# Altium PCB PCjnB3.PcbDoc (part 2 of 2)
Units mil, origin at the board's own origin, x right, y up, seen from the top; angles counter-clockwise.
Board outline 1930 x 3590 mil, 4 copper layers (Top Layer, Gnd, Voltage, Bottom Layer), stack 26.512 mil thick; 77 components, 87 nets, 563 pads, 158 vias.
Unrouted connection lines stored in the file: 78.
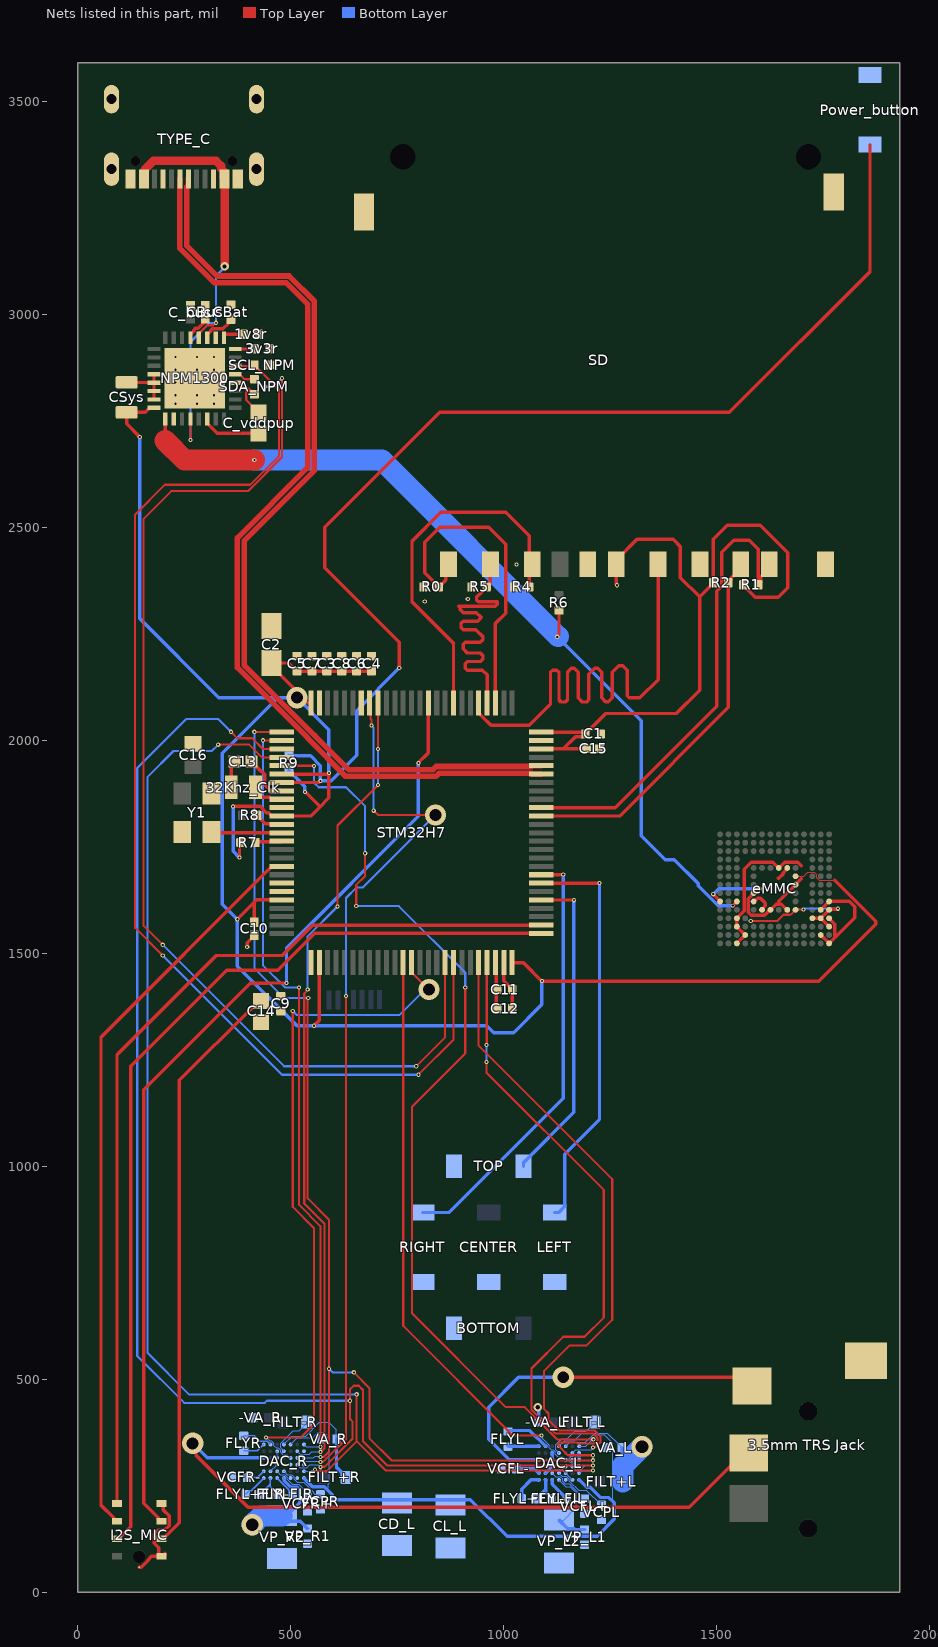
[diagram p3: the nets of this part, all layers, seen from the top]

## Via types
v1: diameter 10, hole 5, Top Layer to Bottom Layer, 144 vias
v2: diameter 50, hole 28, Top Layer to Bottom Layer, 9 vias
v3: diameter 50, hole 30, Top Layer to Bottom Layer, 2 vias
v4: diameter 20, hole 10, Top Layer to Bottom Layer, 2 vias
v5: diameter 8, hole 5, Top Layer to Bottom Layer, 1 vias

## Nets (pads, with @x,y where several pads share a name; then routed paths per layer and width w, separated by ;. In a path a pad name is that pad's centre, name@x,y a point inside that pad or via, vN(x,y) a via of type N, cw(c..) or ccw(c..) an arc to the next point about the centre after c; other vN are vias at no path point) (continued)
FILT-_L: DAC_L.D5 FILT-L.2 | length 137.3
  Bottom Layer w2: DAC_L.D5@1130,327.24 1130,327.76 1122.5,335.26 1122.5,346.1 1136.57,360.17 1149.28,360.17 1167.12,378 1193.12,378 1201.97,386.85 1202.71,386.85 1215.12,399.26 FILT-L.2@1215.12,400
FILT-_R: DAC_R.D5 FILT-R.2 | length 104.8
  Bottom Layer w2: DAC_R.D5@484.25,331.5 484.25,332.01 476.75,339.51 476.75,350.35 506.4,380 520,380 537.56,397.56 FILT-R.2@537.56,400
FLYC_VCPL: DAC_L.F1 FLYL+FIL-.2 FLYLFIL.1 | length 80.3
  Bottom Layer w8: FLYL+FIL-.2@1077.72,220 1077.72,220.98 1098.5,241.77 ; DAC_L.F1@1098.5,264.25 1098.5,241.77 ; FLYLFIL.1@1112.28,220 1112.28,220.98 1098.5,234.76 1098.5,241.77
FLYC_VCPR: DAC_R.F1 FLYL+FIR-.2 FLYLFIR.1 | length 78.8
  Bottom Layer w3: FLYL+FIR-.2@430,230 430,230.98 452.76,253.74 ; DAC_R.F1@452.76,268.5 452.76,253.74 ; FLYLFIR.1@470,230 470,230.98 452.76,248.23 452.76,253.74
FLYN_L: DAC_L.G6 FLYL.2 | length 73.4
  Bottom Layer w8: FLYL.2@1010,344.57 1011.38,343.18 1082.56,343.18 DAC_L.G6@1082.76,342.99
FLYN_R: DAC_R.G6 FLYR.2 | length 53.2
  Bottom Layer w3: FLYR.2@390,332.28 422.05,332.28 DAC_R.G6@437.01,347.24
FLYN_VCPL: DAC_L.G1 FLYL+FIL-.1 | length 71.9
  Bottom Layer w8: FLYL+FIL-.1@1042.28,220 1042.28,242.28 1064.25,264.25 DAC_L.G1@1082.76,264.25
FLYN_VCPR: DAC_R.G1 FLYL+FIR-.1 | length 58.7
  Bottom Layer w3: FLYL+FIR-.1@394.57,230 394.57,230.46 402.84,238.73 407.24,238.73 DAC_R.G1@437.01,268.5
FLYP_L: DAC_L.F6 FLYL.1 | length 103.8
  Bottom Layer w8: FLYL.1@1010,380 1061.5,380 DAC_L.F6@1098.5,342.99
FLYP_R: DAC_R.F6 FLYR.1 | length 71.2
  Bottom Layer w3: FLYR.1@390,367.72 414.96,367.72 427.43,355.24 440.32,355.24 440.52,355.05 444.95,355.05 DAC_R.F6@452.76,347.24
FLYP_VCPL: DAC_L.E1 FLYLFIL.2 | length 58.7
  Bottom Layer w8: DAC_L.E1@1114.25,264.25 1114.25,253.46 1140.89,226.83 1141.87,226.83 1147.72,220.98 FLYLFIL.2@1147.72,220
FLYP_VCPR: DAC_R.E1 FLYLFIR.2 | length 53.8
  Bottom Layer w3: DAC_R.E1@468.5,268.5 468.5,268.21 505.43,231.28 FLYLFIR.2@505.43,230
FS: DAC_L.B3 DAC_R.B3 STM32H7.3 | length 3405.7
  Top Layer w5: v1(360,2020) 375,2005 410,2005 435.15,1979.85 STM32H7.3@479.35,1979.85 ; v1(570,294) 570.96,294.96 579.96,294.96 645,360 645,401.57 639.5,407.07 v1(639.5,450) ; v1@637.19,450 639.5,452.31 639.5,476.57 647.93,485 660,485 670,475 670,355 727,298 v1(1210,298)
  Bottom Layer w2: DAC_R.B3@515.75,300 523.25,292.5 537.74,292.5 545.24,300 564,300 v1(570,294) ; DAC_L.B3@1161.5,295.75 1169,288.25 1181.5,288.25 1191.26,298 v1(1210,298)
  Bottom Layer w5: v1(360,2020) 330,2050 255,2050 140,1935 140,555 250,445 439.32,445 444.32,450 v1(639.5,450)
GND: 1v8r.1 3v3r.1 "3.5mm TRS Jack.1" -VA_L.1 -VA_R.1 BOTTOM.2 C1.2 C2.2 C3.1 C4.1 C5.1 C6.1 C7.1 C8.1 C9.1 C10.1 C11.1 C12.1 C14.1 C15.1 C16.1 C_bus.2 C_vddpup.1 CBat.2 CBus.1 CD_L.1 CENTER.2 CL_L.1 CSys.1 DAC_L.A3 DAC_L.A5 DAC_L.B1 DAC_L.C1 DAC_L.C2 DAC_L.C3 DAC_L.E3 DAC_L.E4 DAC_L.E5 DAC_L.F2 DAC_R.A3 DAC_R.A5 DAC_R.B1 DAC_R.C1 DAC_R.C3 DAC_R.E3 DAC_R.E4 DAC_R.E5 DAC_R.F2 eMMC.A6 eMMC.C1 eMMC.C3 eMMC.C4 eMMC.D2 eMMC.E7 eMMC.G5 eMMC.H10 eMMC.J5 eMMC.K8 eMMC.N2 eMMC.N5 eMMC.P1 eMMC.P4 eMMC.P6 I2S_MIC.5 I2S_MIC.6 I2S_MIC.9 LEFT.2 NPM1300.2 NPM1300.6 NPM1300.18 NPM1300.28 NPM1300.29 NPM1300.30 NPM1300.31 NPM1300.33 Power_button.2 RIGHT.2 SD.3 SD.6 SD.11 SD.12 SD.13 STM32H7.10 STM32H7.19 STM32H7.26 STM32H7.49 STM32H7.74 STM32H7.94 STM32H7.99 TOP.2 TYPE_C.A1_B12 TYPE_C.A8 TYPE_C.B1_A12 TYPE_C.B8 TYPE_C.S1 TYPE_C.S2 TYPE_C.S3 TYPE_C.S4 VA_L.1 VA_R.1 VCFL+.1 VCFL-.1 VCFR+.1 VCFR-.1 VCPL.1 VCPR.1 VP_L1.1 VP_L2.1 VP_R1.1 VP_R2.1 Y1.2 Y1.4 | length 1957.4
  Top Layer w8: CSys.1@115,2840.43 115.39,2840.05 178.95,2840.05 NPM1300.29@179.34,2839.66 ; I2S_MIC.5@145,59.41 149.56,59.41 165.76,75.61 165.76,76.82 173.55,84.61 I2S_MIC.6@190.66,84.61 ; NPM1300.31@179.34,2800.29 NPM1300.28@179.34,2859.34 ; I2S_MIC.6@194.53,84.61 190.66,88.48 190.66,104.48 179.55,115.59 179.55,136.3 189.86,146.61 204.86,146.61 215.17,156.92 215.17,179.83 201.57,193.43 201.57,204.75 197.69,208.62 I2S_MIC.9@197.36,208.62 ; I2S_MIC.6@197.36,84.61 201.3,84.61 205.17,88.48 I2S_MIC.6@205.17,92.42 ; NPM1300.6@304.37,2754 304.37,2744 327.98,2720.39 C_vddpup.1@425,2720.39 ; v1(398,1515) 398.38,1515.38 398.38,1525.24 415,1541.86 C10.1@415,1542.65 ; STM32H7.49@1000.54,1478.35 1000.54,1435.88 1020.43,1415.98 C11.1@1020.43,1415 C12.1@1020.43,1370 ; v1(1492,1639) 1492,1638.52 1508.15,1622.37 eMMC.A6@1508.15,1621.89 ; eMMC.C1@1547.52,1523.46 eMMC.D2@1567.2,1543.15 eMMC.C3@1547.52,1562.83 eMMC.C4@1547.52,1582.52 1565.12,1600.12 1565.12,1697.08 1581.55,1713.52 1632.12,1713.52 1645.01,1700.63 eMMC.H10@1645.94,1700.63 1646.88,1700.63 1659.77,1713.52 1690.65,1713.52 1698.2,1705.97 ; v1(1601,1652) 1600.62,1651.62 1598.5,1651.62 1588.45,1641.57 eMMC.E7@1586.89,1641.57 1586.89,1640.64 1574,1627.75 1574,1596.87 1581.55,1589.31 1612.44,1589.31 1625.33,1602.2 eMMC.G5@1626.26,1602.2 1627.19,1602.2 1640.08,1615.09 1645.94,1615.09 ; eMMC.J5@1665.63,1602.2 1664.7,1602.2 1651.81,1615.09 1645.94,1615.09 ; 1698.2,1675.08 1685.31,1662.19 eMMC.K8@1685.31,1661.26 1645.94,1621.89 1645.94,1615.09 ; eMMC.N2@1744.37,1543.15 eMMC.P1@1764.06,1523.46 1824,1583.41 1824,1609.41 1811.52,1621.89 eMMC.P6@1764.06,1621.89 eMMC.N5@1744.37,1602.2 ; eMMC.P4@1764.06,1582.52 1764.06,1581.59 1776.94,1568.7 1776.94,1537.29
  Bottom Layer w2: DAC_R.F2@452.76,284.25 DAC_R.E3@468.5,300 DAC_R.E5@468.5,331.5 ; DAC_L.E3@1114.25,295.75 1122.13,287.87 1137.87,287.87 ; DAC_L.C3@1145.75,295.75 1137.87,287.87 ; DAC_L.B1@1161.5,264.25 1160.98,264.25 1145.75,279.48 DAC_L.C2@1145.75,280 1137.87,287.87 ; DAC_L.A3@1177.24,295.75 1171.94,301.05 1167.97,301.05 1165.03,304 1158.39,304 1154,308.39 1154,314.6 1159.14,319.74 1164.6,319.74 1167.85,323 1171.1,323 1175.35,327.24 DAC_L.A5@1177.24,327.24
  Bottom Layer w8: v4(1079.95,434.95) 1079.95,431.7 1082.28,429.37 -VA_L.1@1082.28,400 ; DAC_L.F2@1098.5,280 DAC_L.E3@1114.25,295.75 DAC_L.E4@1114.25,311.5 DAC_L.E5@1114.25,327.24 ; v1(1492,1639) 1505,1652 v1(1601,1652)
  other v1: 230,2790 280,2790 320,2790 230,2810 280,2810 320,2810 230,2840 280,2840 320,2840 230,2870 280,2870 320,2870 230,2900 280,2900 320,2900
I2C1_SCL: DAC_R.B5 STM32H7.92 | length 1913.7
  Top Layer w5: v1(540,1415) 540,1413.65 532,1405.65 532,913 579.5,865.5 579.5,338.07 573.94,332.5 573.85,332.5 571.35,330 v1(570,330) ; v1(610,1610) 610,1800 v1(705,1895) ; v1(705,1980) 705.13,1980.13 705.13,2087.52 STM32H7.92@705.26,2087.65
  Bottom Layer w2: DAC_R.B5@515.75,331.5 523.25,324 543.49,324 549.49,330 v1(570,330)
  Bottom Layer w5: v1(540,1415) 540,1540 v1(610,1610) ; v1(705,1895) v1(705,1980)
I2C1_SDA: DAC_R.B4 STM32H7.93 | length 2107.1
  Top Layer w5: v1(570,306) 570.96,306.96 576.86,306.96 630,360.1 v1(630,1400) ; STM32H7.93@685.57,2087.65 687.59,2085.63 687.59,2051.11 690,2048.7 v1(690,2035) ; v1(695,1835) 705,1825 v2(840,1825)
  Bottom Layer w2: DAC_R.B4@515.75,315.75 523.25,308.25 565.59,308.25 567.84,306 v1(570,306)
  Bottom Layer w5: v1(630,1400) 630,1630 655,1655 670,1655 v2(840,1825) ; v1(690,2035) 695,2030 v1(695,1835)
I2C2_SCL: DAC_L.B5 STM32H7.46 | length 1526.9
  Top Layer w5: STM32H7.46@941.48,1478.35 941.48,1283.52 1255,970 1255,640 1195,580 1155,580 1094.45,519.45 1094.45,431.06 1105.5,420 1105.5,404.5 1130,380 1213.33,380 1227.16,366.18 1227.16,352.51 1215.95,341.3 1210.96,341.3 v1(1210,340.34)
  Bottom Layer w2: DAC_L.B5@1161.5,327.24 1169,334.74 1206.74,334.74 1210,338 v1(1210,340.34)
I2C2_SDA: DAC_L.B4 STM32H7.47 | length 1699.3
  Top Layer w5: v1(960,1245) 960,1220 1235,945 1235,645 1190,600 1140,600 1065.45,525.45 1065.45,428.94 1121.39,373 1210.43,373 1220.16,363.28 1220.16,355.41 1214.59,349.84 1173.79,349.84 1171.29,352.34 1130.48,352.34 1127.55,349.41 1127.55,345.27 1150.82,322 v1(1210,322) ; v1(960,1285) 960.58,1285.58 960.58,1477.77 STM32H7.47@961.17,1478.35
  Bottom Layer w2: DAC_L.B4@1161.5,311.5 1162.01,311.5 1169.51,319 1179.6,319 1182.61,322 v1(1210,322)
  Bottom Layer w5: v1(960,1245) v1(960,1285)
I2S_CK: I2S_MIC.1 STM32H7.52 | length 2175.9
  Top Layer w8: I2S_MIC.1@92.64,208.62 92.64,1262.64 325,1495 480,1495 551.46,1566.46 STM32H7.52@1088.65,1566.46
I2S_DIN: I2S_MIC.2 STM32H7.17 | length 1744.6
  Top Layer w8: I2S_MIC.2@92.64,167.28 88.7,167.28 84.83,171.16 84.83,175.09 55,204.92 55,1303.65 448.05,1696.7 448.66,1696.7 456.22,1704.26 STM32H7.17@479.35,1704.26
I2S_WS: I2S_MIC.3 STM32H7.51 | length 2217.6
  Top Layer w8: I2S_MIC.3@92.64,125.94 96.57,125.94 125,154.37 125,1235 350,1460 470,1460 556.78,1546.78 STM32H7.51@1088.65,1546.78
I2SEN: I2S_MIC.8 STM32H7.86 | length 2266.8
  Top Layer w8: I2S_MIC.8@197.36,167.28 193.43,167.28 189.55,171.16 189.55,175.09 155,209.65 155,1180 405,1430 446.62,1430 447.15,1430.53 v1(490.37,1430.53) ; v1(800,1947) 823.37,1970.37 STM32H7.86@823.37,2087.65
  Bottom Layer w8: v1(490.37,1430.53) 490.37,1512.19 800,1821.82 v1(800,1947)
LEFT: LEFT.1 STM32H7.57 | length 958.4
  Top Layer w8: STM32H7.57@1088.65,1664.89 1088.7,1664.94 1224.94,1664.94 v1(1225,1665)
  Bottom Layer w8: LEFT.1@1120,891.69 1128.86,891.69 1143.56,906.39 1143.56,1028.56 1225,1110 v1(1225,1665)
MLCK: DAC_L.A4 DAC_R.A4 STM32H7.1 | length 2738.7
  Top Layer w2: STM32H7.1@478.57,2020 STM32H7.1@479.35,2019.22
  Top Layer w5: v1(415,2020) STM32H7.1@478.57,2020 ; v1(541.5,1395) 540.54,1394.04 540.54,1390.51 540,1389.96 540,925 590,875 590,330 578,318 v1(570,318) ; v1(648.46,516.54) 685,480 685,362 737,310 v1(1210,310)
  Bottom Layer w2: DAC_R.A4@531.5,315.75 553.58,315.75 557.37,319.53 568.47,319.53 v1(570,318) ; DAC_L.A4@1177.24,311.5 1177.99,310.75 1209.25,310.75 v1(1210,310)
  Bottom Layer w5: v1(415,2020) 415,1465 485,1395 v1(541.5,1395) ; v1(590,525) 598.46,516.54 v1(648.46,516.54)
Net32Khz_Clk_2: 32Khz_Clk.2 C13.1 | length 63.1
  Top Layer w8: 32Khz_Clk.2@360.46,1890 360.46,1942.54 C13.1@367.92,1950
nPMSCL: NPM1300.14 SCL_NPM.2 STM32H7.43 | length 2753.3
  Top Layer w5: v1(200,1495) 135,1560 135,2530 205,2600 405.1,2600 473,2667.9 473,2822.3 422.63,2872.67 415.28,2880.02 SCL_NPM.2@415.28,2881 413.31,2879.03 NPM1300.14@370.34,2879.03 ; v1(800,1215) 882.43,1297.43 STM32H7.43@882.43,1478.35
  Bottom Layer w5: v1(200,1495) 480,1215 v1(800,1215)
nPMSDA: NPM1300.13 SDA_NPM.2 STM32H7.42 | length 2702.3
  Top Layer w5: v1(200,1520) 155,1565 155,2520 220,2585 400,2585 480,2665 v1(480,2850) ; NPM1300.13@370.34,2859.34 380.34,2859.34 391.97,2847.72 SDA_NPM.2@415,2847.72 ; SDA_NPM.2@415.98,2847.72 432.74,2830.96 439.04,2830.96 v1(440,2830) ; v1(795,1235) 862.74,1302.74 STM32H7.42@862.74,1478.35
  Bottom Layer w5: v1(200,1520) 485,1235 v1(795,1235) ; v1(440,2830) 460,2830 v1(480,2850)
NRST: R7.1 STM32H7.14 | length 63
  Top Layer w8: R7.1@417.72,1760 419.37,1761.66 477.7,1761.66 STM32H7.14@479.35,1763.32
Osc25mhzin: R8.2 STM32H7.12 | length 67
  Top Layer w8: R8.2@421.72,1824 421.72,1823.02 440.14,1804.59 477.45,1804.59 STM32H7.12@479.35,1802.68
Osc25mhzout: STM32H7.13 Y1.1 | length 154
  Top Layer w8: Y1.1@326.45,1785.72 329.17,1783 STM32H7.13@479.35,1783
Osc32khz_in: C13.2 STM32H7.8 | length 113.8
  Top Layer w8: C13.2@408.08,1950 429.94,1928.14 431.63,1928.14 439.52,1920.24 439.52,1896.1 452.29,1883.33 477.45,1883.33 STM32H7.8@479.35,1881.43
Osc32khz_out: 32Khz_Clk.1 STM32H7.9 | length 81
  Top Layer w8: 32Khz_Clk.1@417.54,1890 417.54,1877.2 428.31,1866.44 451.52,1866.44 456.22,1861.74 STM32H7.9@479.35,1861.74
Power_button: Power_button.1 R9.1 STM32H7.7 | length 2797
  Top Layer w8: STM32H7.7@479.35,1901.11 565.57,1901.11 569.46,1905 v1(570,1905) ; v1(755,2170) 755,2230 580,2405 580,2500 850,2770 1530,2770 1860,3100 1860,3398.31
  Bottom Layer w8: R9.1@496,1963.72 546.84,1963.72 570,1940.56 v1(570,1905) 595,1905 655,1965 655,2070 v1(755,2170)
RESET_L: DAC_L.C4 STM32H7.37 | length 1373.9
  Top Layer w5: STM32H7.37@764.31,1478.35 764.31,625.68 1021.5,368.5 v1(1089.17,368.5)
  Bottom Layer w2: v1(1089.17,368.5) 1090.7,366.97 1090.7,361.4 1106.75,345.35 1106.75,339.89 1111.52,335.12 1116.98,335.12 1121.75,330.35 1121.75,324.89 1127.64,319 1138.25,319 DAC_L.C4@1145.75,311.5
RESET_R: DAC_R.C4 STM32H7.38 | length 1630.5
  Top Layer w5: v1(442.13,363.55) 523.55,363.55 555,395 555,855 505,905 v1(505,1365) ; STM32H7.38@784,1478.35 784,1455.22 824.22,1415 v2(825,1415)
  Bottom Layer w2: v1(442.13,363.55) 442.81,363.55 450.51,355.86 454.75,355.86 460.91,349.7 460.91,344.23 465.96,339.18 471.42,339.18 476.38,334.23 476.38,328.76 481.89,323.25 492.5,323.25 DAC_R.C4@500,315.75
  Bottom Layer w5: v1(505,1365) 515,1355 755,1355 815,1415 v2(825,1415)
RIGHT: RIGHT.1 STM32H7.58 | length 1017.7
  Top Layer w8: STM32H7.58@1088.65,1684.57 1088.86,1684.79 1139.79,1684.79 v1(1140,1685)
  Bottom Layer w8: RIGHT.1@810,891.69 871.69,891.69 1140,1160 v1(1140,1685)
RING: "3.5mm TRS Jack.3" DAC_R.G4 | length 1619.3
  Top Layer w8: v2(270,350) 278.04,341.96 278.04,321.96 400,200 1435.55,200 1533.96,298.41 1533.96,300.38 1573.27,339.68 1575.24,339.68
  Bottom Layer w8: v2(270,350) 304.25,315.75 DAC_R.G4@437.01,315.75
SAISCK: DAC_L.A2 DAC_R.A2 STM32H7.4 | length 3126.7
  Top Layer w5: v1(330,1990) 402.79,1990 432.62,1960.17 STM32H7.4@479.35,1960.17 ; v1(557.23,288.24) 558.58,288.24 562.32,284.5 584.5,284.5 655,355 ; v1(655,465) 655,355 ; v1(1210,286) 724,286 655,355
  Bottom Layer w2: DAC_R.A2@531.5,284.25 546.76,284.25 549.23,286.72 555.71,286.72 v1(557.23,288.24) ; DAC_L.A2@1177.24,280 1178.91,280 1184.91,286 v1(1210,286)
  Bottom Layer w5: v1(330,1990) 315,1975 225,1975 164.33,1914.33 164.33,561.87 261.19,465 v1(655,465)
SD_A: DAC_L.A6 STM32H7.5 | length 2261.5
  Top Layer w5: STM32H7.5@479.35,1940.48 554.52,1940.48 v1(555,1940) ; v1(654,1611) 654,1660.72 675,1681.72 v1(675,1735) ; v1(910,1420) 910,1265 785,1140 785,655 1005,435 1049.49,435 1125.15,359.34 v1(1210.66,359.34)
  Bottom Layer w2: DAC_L.A6@1177.24,342.99 1192.99,342.99 1209.34,359.34 v1(1210.66,359.34)
  Bottom Layer w5: v1(555,1940) 555,1900.96 565.96,1890 630,1890 675,1845 v1(675,1735) ; v1(654,1611) 754,1611 910,1455 v1(910,1420)
SD_B: DAC_R.A6 STM32H7.2 | length 1818.2
  Top Layer w2: STM32H7.2@478.89,2000 STM32H7.2@479.35,1999.54
  Top Layer w5: v1(435,2000) STM32H7.2@478.89,2000 ; v1(520,1420) 520,909.58 570,859.58 v1(570,342)
  Bottom Layer w2: DAC_R.A6@531.5,347.24 536.74,342 v1(570,342)
  Bottom Layer w5: v1(435,2000) 435,1472.47 487.47,1420 v1(520,1420)
SD_CLK: SD.5 STM32H7.80 | length 1323.3
  Top Layer w8: STM32H7.80@941.48,2087.65 941.48,2064.52 949.04,2056.95 949.04,2056.34 970.38,2035 1060,2035 1105,2080 1105.31,2080 1110,2084.69 1110,2160 1115,2165 1125,2165 1130,2160 1130,2094.69 1134.69,2090 1145,2090 1150,2095 1150,2160 1159.19,2169.19 1165.81,2169.19 1175,2160 1175,2100 1185,2090 1195,2090 1200,2095 1200,2155 1214.19,2169.19 1220.81,2169.19 1230,2160 1230,2100 1239.19,2090.81 1245.81,2090.81 1255,2100 1255,2160 1270,2175 1280,2175 1290,2165 1290,2104.69 1294.69,2100 1320,2100 1362.65,2142.65 SD.5@1362.65,2413.31
SD_CMD: R4.2 SD.2 STM32H7.83 | length 866
  Top Layer w8: STM32H7.83@882.43,2087.65 882.43,2227.57 785,2325 785,2467.5 852.5,2535 1005,2535 1060,2480 1060,2413.31 R4.2@1060,2360
SD_DAT0: R2.2 SD.7 STM32H7.65 | length 892.4
  Top Layer w8: STM32H7.65@1088.65,1822.37 1272.37,1822.37 1527.72,2077.72 R2.2@1527.72,2370 1533.56,2375.84 1533.56,2380.47 1556.55,2403.46 SD.7@1556.55,2413.31
SD_DAT1: R1.2 SD.8 STM32H7.66 | length 1125.8
  Top Layer w8: STM32H7.66@1088.65,1842.06 1262.06,1842.06 1500,2080 1500,2350 1511.87,2361.88 1511.87,2441.87 1540,2470 1576.63,2470 1597.72,2448.91 R1.2@1597.72,2365 1603.56,2370.84 1603.56,2383.54 1623.48,2403.46 SD.8@1623.48,2413.31
SD_DAT2: R0.2 SD.9 STM32H7.78 | length 789
  Top Layer w8: SD.9@870.53,2413.31 875,2408.83 864.18,2398.02 864.18,2376.47 854.54,2366.83 853.56,2366.83 R0.2@847.72,2360.98 ; STM32H7.78@980.85,2087.65 980.85,2274.27 1005,2298.42 1005,2460 965,2500 850,2500 815,2465 815,2393.7 R0.2@847.72,2360.98 ; R0.2@847.72,2360.98 R0.2@847.72,2360 R0.2@847.72,2360.98
SD_DAT3: R5.2 SD.1 STM32H7.79 | length 744.4
  Top Layer w8: R5.2@960,2360.98 968.95,2369.94 SD.1@968.95,2413.31 ; R5.2@960.58,2359.42 R5.2@960,2360 960,2359.02 942.95,2341.97 941.97,2341.97 936.31,2336.31 936.31,2329.69 941,2325 985,2325 985,2319.69 980.31,2315 895,2315 898.47,2311.53 898.47,2306.84 900,2305.31 900,2305 905,2300 935.75,2300 947.06,2288.69 943.69,2285.31 943.69,2284.69 939,2280 905,2280 900,2275 900,2265 905,2260 935,2260 951.69,2243.31 951.69,2236.69 945,2230 909.69,2230 905,2225.31 905,2215 915,2205 945,2205 951.69,2198.31 951.69,2191.69 945,2185 915,2185 910,2180 910,2169.69 914.69,2165 950,2165 961.17,2153.83 STM32H7.79@961.17,2087.65
TIP: "3.5mm TRS Jack.2" DAC_L.G4 | length 863.4
  Top Layer w8: v2(1140,505) 1575.28,505 1583.11,497.17
  Bottom Layer w8: DAC_L.G4@1082.76,311.5 1013.07,311.5 965,359.57 965,435 1035,505 v2(1140,505)
TOP: STM32H7.55 TOP.1 | length 750.6
  Top Layer w8: STM32H7.55@1088.65,1625.52 1088.91,1625.26 1164.74,1625.26 v1(1165,1625)
  Bottom Layer w8: TOP.1@1046.69,1000 1046.69,1008.86 1165,1127.17 v1(1165,1625)
USB_D_N: STM32H7.70 TYPE_C.A7 | length 2262.3
  Top Layer w13: TYPE_C.A7@240.16,3317.99 240.16,3154.84 321,3074 490,3074 540,3024 540,2640 375,2475 375,2170.54 540.5,2005.04 540.5,2004.5 629.5,1915.5 841.18,1915.5 848.31,1922.64 1064.86,1922.64 1066.7,1920.8 STM32H7.70@1088.65,1920.8
USB_D_P: STM32H7.71 TYPE_C.A6 | length 2237.3
  Top Layer w13: TYPE_C.A6@259.84,3317.99 259.84,3302.65 256.16,3298.96 256.16,3161.47 327.62,3090 496.63,3090 556,3030.63 556,2633.37 391,2468.37 391,2177.16 556.5,2011.66 556.5,2011.12 636.12,1931.5 834.55,1931.5 841.69,1938.64 1064.86,1938.64 1066.7,1940.48 STM32H7.71@1088.65,1940.48
VAL: CD_L.2 CL_L.2 DAC_L.A1 DAC_L.C6 DAC_L.D1 DAC_L.D2 DAC_L.D6 DAC_R.A1 DAC_R.C6 DAC_R.D1 DAC_R.D2 DAC_R.D6 eMMC.C6 eMMC.K5 eMMC.M4 eMMC.N4 eMMC.P3 eMMC.P5 FILT+L.2 FILT+R.2 NPM1300.1 R6.2 VA_L.2 VA_R.2 VCPL.2 VCPR.2 VP_L1.2 VP_L2.2 VP_R1.2 VP_R2.2 | length 5164.1
  Top Layer w5: v1(1580,1576) 1642.05,1576 1656.86,1590.81 1670.35,1590.81 ; 1670.37,1590.84 1673.95,1590.84 eMMC.K5@1685.31,1602.2 1685.71,1602.6 1703.6,1602.6 v1(1704,1603)
  Top Layer w8: 205.94,2703.06 NPM1300.1@205.94,2754 ; v1(1126,2243) 1126,2243.54 1130,2247.54 R6.2@1130,2305 ; v5(1538,1612) 1547.52,1621.52 eMMC.C6@1547.52,1621.89 ; eMMC.M4@1724.69,1582.52 eMMC.N4@1744.37,1582.52 ; eMMC.P3@1764.06,1562.83 eMMC.N4@1744.37,1582.52 ; v1(1785,1605) 1784.46,1605 1782.77,1603.31 1765.16,1603.31 eMMC.P5@1764.06,1602.2 eMMC.N4@1744.37,1582.52
  Top Layer w50: 205.94,2703.06 251,2658 v1(415,2658)
  Bottom Layer w1: VP_L2.2@1130,170 1140.83,170 1170.38,199.56 1170.38,234.39 1156.71,248.06 1146.19,248.06 DAC_L.D1@1130,264.25 ; DAC_L.D2@1130,280 1137.19,272.81 1147.09,272.81 1154.5,265.4 1154.5,261.35 1175.85,240 1194.45,240 1229.02,205.43 VCPL.2@1230,205.43
  Bottom Layer w2: DAC_R.D2@484.25,284.25 484.77,284.25 492.27,276.75 502.36,276.75 508.25,270.86 508.25,265.4 515.3,258.35 530.56,258.35 553.83,235.08 553.83,232.35 556.17,230 VCPR.2@570,230 ; DAC_R.D6@484.25,347.24 504.15,367.14 535,367.14 567.86,400 590,400 607.72,382.28 VA_R.2@607.72,360 ; DAC_R.C6@500,347.24 515.9,363.14 551.95,363.14 565.09,376.27 579.48,376.27 585.13,370.63 585.13,364.87 590.88,359.12 590.88,255.7 588.69,253.51 588.69,239.02 ; DAC_L.D6@1130,342.99 1143.17,356.17 1166.17,356.17 1184,374 1243.72,374 1268.79,348.93 1268.99,348.93 1277.72,340.19 VA_L.2@1277.72,340 ; DAC_L.C6@1145.75,342.99 1154.92,352.17 1192.17,352.17 1210,370 1235.75,370 1255.96,349.79 1255.96,214.04
  Bottom Layer w5: v1(1704,1603) 1705.35,1603 1707.35,1605 v1(1785,1605)
  Bottom Layer w8: VP_R2.2@480,180 492.75,167.25 522.75,167.25 533.17,156.83 533.17,155.84 539.02,150 VP_R1.2@540,150 ; DAC_R.D1@484.25,268.5 484.44,268.31 484.44,263.55 500.65,247.35 515.8,247.35 521.28,241.87 521.28,210.45 VP_R2.2@490.83,180 ; DAC_R.A1@531.5,268.5 551.49,248.51 579.2,248.51 588.69,239.02 598.18,229.53 598.18,222.67 602.87,217.98 922.02,217.98 1008.13,131.87 1219.59,131.87 1260,172.29 1260,210 1255.96,214.04 1247.28,222.72 1227.62,222.72 1203.84,246.5 1195,246.5 DAC_L.A1@1177.24,264.25 ; VA_R.2@607.72,360 607.72,294.24 630,271.96 FILT+R.2@630,270 ; v1(1126,2243) 1323,2046 1323,1776.44 1379.22,1720.22 1400.78,1720.22 1457,1664 1457,1658.44 1503.44,1612 v5(1538,1612) ; VP_L2.2@1130,170 1150.61,149.39 1165.5,149.39 1167.17,147.72 VP_L1.2@1190,147.72 ; VA_L.2@1277.72,340 1278.86,338.86 1278.86,297
  Bottom Layer w50: v3(410,159) 430.61,179.61 479.61,179.61 VP_R2.2@480,180 ; v1(415,2658) 714,2658 v1@1128,2244 ; FILT+L.2@1280,260 1280,297 v3(1325,342)
VBAT: CBat.1 NPM1300.19 | length 88.1
  Top Layer w8: NPM1300.19@304.37,2945 304.37,2955 305.37,2956 308.37,2956 313.06,2960.69 313.06,2962.49 316.57,2966 341,2966 353.17,2978.17 353.17,2981.44 361.72,2989.98 CBat.1@364.98,2989.98
VBUSIN: CBus.2 NPM1300.21 | length 66.1
  Top Layer w8: NPM1300.21@265,2945 265,2955 266,2956 268,2956 272.69,2960.69 272.69,2962.9 276.79,2967 283.14,2967 305,2988.86 CBus.2@305,2989.65
VCAP: C1.1 C2.1 C3.2 C4.2 C5.2 C6.2 C7.2 C8.2 C9.2 C10.2 C11.2 C12.2 C14.2 C15.2 CSys.2 eMMC.E6 eMMC.F5 eMMC.J10 eMMC.K9 I2S_MIC.7 NPM1300.32 R0.1 R1.1 R2.1 R4.1 R5.1 R7.2 R9.2 SD.4 STM32H7.6 STM32H7.11 STM32H7.20 STM32H7.21 STM32H7.27 STM32H7.48 STM32H7.50 STM32H7.73 STM32H7.75 STM32H7.100 | length 8679.3
  Top Layer w1: eMMC.K9@1683.75,1680.94 1684.39,1681.58 1704.62,1681.58 1713.37,1690.33 1728.57,1690.33 1734.53,1684.38 1734.53,1677.51 1740.48,1671.56 1776.89,1671.56 1777.17,1671.83
  Top Layer w8: CSys.2@115,2769.96 115,2743 v1(146,2712) ; CSys.2@130,2770 158.74,2770 169.34,2780.6 NPM1300.32@179.34,2780.6 ; I2S_MIC.7@197.36,125.94 201.3,125.94 239,163.65 239,1202 410.91,1373.91 416.3,1373.91 434.41,1392.02 C14.2@434.41,1397.41 ; v1(365,1845) 428.43,1845 443.28,1830.15 448.44,1830.15 456.22,1822.37 STM32H7.11@479.35,1822.37 547.37,1822.37 567,1842 ; v1(375,1580) 415,1620 ; v1(380,1725) 380,1757.72 R7.2@382.28,1760 ; C10.2@415,1573.35 415,1620 ; STM32H7.21@479.35,1625.52 420.52,1625.52 415,1620 ; STM32H7.6@479.35,1920.8 586.92,1920.8 589.46,1923.33 v1(590,1923.33) 590,1865 567,1842 ; v1(534,1879) 567,1846 567,1842 ; STM32H7.100@547.78,2087.65 539.26,2087.65 526.64,2100.27 v2(515.27,2100.27) 507.23,2108.31 507.23,2122.57 455,2174.8 C2.1@455,2181.69 494.61,2181.69 514.02,2162.28 C5.2@515,2162.28 C7.2@550,2162.28 C3.2@585,2162.28 C8.2@620,2162.28 C6.2@655,2162.28 C4.2@690,2162.28 ; v1(555,1330) 567.46,1342.46 STM32H7.27@567.46,1478.35 ; STM32H7.48@980.85,1478.35 982.76,1476.45 982.76,1372.24 C12.2@985,1370 ; STM32H7.50@1020.22,1478.35 1046.65,1478.35 v1(1090,1435) 1740,1435 1873.69,1568.69 1873.69,1575.31 1777.17,1671.83 ; STM32H7.75@1088.65,2019.22 1186.44,2019.22 1189.36,2016.3 1189.36,2011.64 1186.44,2008.72 1168.72,2008.72 1139.93,1979.93 ; STM32H7.73@1088.72,1979.93 1139.93,1979.93 ; C1.1@1192.28,2015 1192.28,2015.98 1239.3,2063 1405,2063 1460,2118 1460,2337 ; C15.2@1194.65,1980 1194.57,1979.93 1139.93,1979.93 ; v1(1266,2364) 1266,2364.54 1264.23,2366.31 SD.4@1264.23,2413.31 1264.23,2423.15 1313.08,2472 1398,2472 1415,2455 1415,2382 1460,2337 ; R1.1@1562.28,2365 1562.28,2364.02 1590.3,2336 1645,2336 1667,2358 1667,2440.31 1602.31,2505 1525,2505 1492.28,2472.28 R2.1@1492.28,2370 1492.28,2369.02 1473.35,2350.09 1473.09,2350.09 1460,2337 ; eMMC.E6@1589.89,1623.33 1596.3,1629.74 1602.93,1629.74 1614.42,1618.24 1614.42,1611.62 1606.57,1603.77 eMMC.F5@1606.57,1602.2 ; 1644,1676 1645.75,1676 1656.06,1686.31 1656.06,1689.5 1665.63,1699.07 eMMC.J10@1665.63,1700.63
  Bottom Layer w8: v1(146,2712) 146,2286 331.73,2100.27 470.27,2100.27 ; v1(365,1845) 365,1740 v1(380,1725) ; R9.2@496,1928.28 496.98,1928.28 533.62,1891.65 533.62,1879.38 v1(534,1879) ; v1(590,1923.33) 590,2025 515.27,2099.73 v2(515.27,2100.27) 470.27,2100.27 ; v1(1090,1435) 1090,1380 1023.31,1313.31 976.69,1313.31 960,1330 v1(555,1330) 515,1330 375,1470 v1(375,1580) 340,1615 340,1970 470.27,2100.27
  other v1: 815,2326 916,2332 1030,2413
VCP_F+L: DAC_L.E2 VCFL+.2 | length 100.4
  Bottom Layer w2: DAC_L.E2@1114.25,280 1122.5,271.75 1133.11,271.75 1138.25,266.61 1138.25,261.15 1143.98,255.41 1154.31,255.41 1182.28,227.44 VCFL+.2@1182.28,220
VCP_F+R: DAC_R.E2 VCFR+.2 | length 99
  Bottom Layer w2: DAC_R.E2@468.5,284.25 476,276.75 486.61,276.75 492.5,270.86 492.5,265.4 503.55,254.35 518.7,254.35 531.27,241.78 531.27,238.93 540,230.19 VCFR+.2@540,230
VCP_F-L: DAC_L.G2 VCFL-.2 | length 56.9
  Bottom Layer w8: VCFL-.2@1030,290 1072.49,290 1082.49,280 DAC_L.G2@1082.76,280
VCP_F-R: DAC_R.G2 VCFR-.2 | length 45.2
  Bottom Layer w3: VCFR-.2@397.72,270 422.76,270 DAC_R.G2@437.01,284.25
VDDIO: C_vddpup.2 NPM1300.12 SCL_NPM.1 SDA_NPM.1 | length 122.7
  Top Layer w5: NPM1300.12@370.34,2839.66 380.34,2839.66 395.82,2824.18 395.82,2798.79 C_vddpup.2@425,2769.61
  Top Layer w8: 395.82,2824.18 402.12,2824.18 414.02,2812.28 SDA_NPM.1@415,2812.28
VNET: NPM1300.4 NPM1300.20 TYPE_C.A4_B9 TYPE_C.B4_A9 | length 1015.1
  Top Layer w5: v1(265,2705) NPM1300.4@265,2754 ; NPM1300.20@284.69,2945 284.69,2955 303.81,2974.12 312.67,2974.12 313.05,2974.5 318.15,2974.5 323.65,2980 v1(325,2980)
  Top Layer w20: TYPE_C.B4_A9@155.51,3317.99 157.32,3319.8 157.32,3339.53 177.79,3360 325.09,3360 336.8,3348.28 336.8,3342.15 342.68,3336.27 342.68,3319.8 TYPE_C.A4_B9@344.49,3317.99 ; v4(345,3112.5) TYPE_C.A4_B9@345,3317.48
  Bottom Layer w5: v1(265,2705) 265,2935 310,2980 v1(325,2980) 325,3090 345,3110 v4@345,3115
VSET1: 1v8r.2 NPM1300.17 | length 54
  Top Layer w8: NPM1300.17@343.74,2945 343.74,2952 344.74,2953 1v8r.2@390.28,2953
VSET2: 3v3r.2 NPM1300.16 | length 45.5
  Top Layer w8: NPM1300.16@370.34,2918.4 370.64,2918.7 415.27,2918.7 3v3r.2@415.57,2919
pads on no net: "3.5mm TRS Jack.4" "3.5mm TRS Jack." DAC_L.B2 DAC_L.B6 DAC_L.C5 DAC_L.D3 DAC_L.F3 DAC_L.F4 DAC_L.F5 DAC_L.G3 DAC_L.G5 DAC_R.B2 DAC_R.B6 DAC_R.C2 DAC_R.C5 DAC_R.D3 DAC_R.F3 DAC_R.F4 DAC_R.F5 DAC_R.G3 DAC_R.G5 eMMC.A1 eMMC.A2 eMMC.A7 eMMC.A8 eMMC.A9 eMMC.A10 eMMC.A11 eMMC.A12 eMMC.A13 eMMC.A14 eMMC.B1 eMMC.B3 eMMC.B4 eMMC.B5 eMMC.B6 eMMC.B7 eMMC.B8 eMMC.B9 eMMC.B10 eMMC.B11 eMMC.B12 eMMC.B13 eMMC.B14 eMMC.C2 eMMC.C5 eMMC.C7 eMMC.C8 eMMC.C9 eMMC.C10 eMMC.C11 eMMC.C12 eMMC.C13 eMMC.C14 eMMC.D1 eMMC.D3 eMMC.D4 eMMC.D12 eMMC.D13 eMMC.D14 eMMC.E1 eMMC.E2 eMMC.E3 eMMC.E5 eMMC.E8 eMMC.E9 eMMC.E10 eMMC.E12 eMMC.E13 eMMC.E14 eMMC.F1 eMMC.F2 eMMC.F3 eMMC.F10 eMMC.F12 eMMC.F13 eMMC.F14 eMMC.G1 eMMC.G2 eMMC.G3 eMMC.G10 eMMC.G12 eMMC.G13 eMMC.G14 eMMC.H1 eMMC.H2 eMMC.H3 eMMC.H5 eMMC.H12 eMMC.H13 eMMC.H14 eMMC.J1 eMMC.J2 eMMC.J3 eMMC.J12 eMMC.J13 eMMC.J14 eMMC.K1 eMMC.K2 eMMC.K3 eMMC.K6 eMMC.K7 eMMC.K10 eMMC.K12 eMMC.K13 eMMC.K14 eMMC.L1 eMMC.L2 eMMC.L3 eMMC.L12 eMMC.L13 eMMC.L14 eMMC.M1 eMMC.M2 eMMC.M3 eMMC.M7 eMMC.M8 eMMC.M9 eMMC.M10 eMMC.M11 eMMC.M12 eMMC.M13 eMMC.M14 eMMC.N1 eMMC.N3 eMMC.N6 eMMC.N7 eMMC.N8 eMMC.N9 eMMC.N10 eMMC.N11 eMMC.N12 eMMC.N13 eMMC.N14 eMMC.P2 eMMC.P7 eMMC.P8 eMMC.P9 eMMC.P10 eMMC.P11 eMMC.P12 eMMC.P13 eMMC.P14 I2S_MIC. I2S_MIC.4 NPM1300.3 NPM1300.5 NPM1300.7 NPM1300.8 NPM1300.9 NPM1300.10 NPM1300.11 NPM1300.15 NPM1300.25 NPM1300.26 NPM1300.27 SD.MH1 SD.MH2 STM32H7.15 STM32H7.18 STM32H7.23 STM32H7.24 STM32H7.25 STM32H7.30 STM32H7.35 STM32H7.36 STM32H7.39 STM32H7.40 STM32H7.41 STM32H7.44 STM32H7.45 STM32H7.59 STM32H7.60 STM32H7.62 STM32H7.63 STM32H7.64 STM32H7.67 STM32H7.68 STM32H7.69 STM32H7.77 STM32H7.81 STM32H7.82 STM32H7.84 STM32H7.85 STM32H7.87 STM32H7.88 STM32H7.91 STM32H7.95 STM32H7.96 STM32H7.97 STM32H7.98 TYPE_C. TYPE_C.B6 TYPE_C.B7
copper on no net:
  other v1: 990,1335 1888,1458 1456,1466 1669,1491 872,1605 1416,1609 930,1626 826,1634 742,1647 573,1657 863,1669 990,1676 807,1692 896,1705 1487,1719 957,1721 1649,1727 1839.08,1731.53 1839.08,1731.53 568,1761 734,1786 1825,1807 1010,1812 913,1814 1673,1820 1511,1826 1789,1827 953,1853 755,1865 909,1874 1016,1875 960,1886 941,2000 888,2001

## Polygon pours and split planes (outlines as drawn)
no net on Gnd "VoltageMMC" (solid, pour order 2): 1926,3586 1924,3584 1924,5 1,5 1,3586
GND on Bottom Layer "VoltageMMC" (solid, pour order 0): 1901,3585 1901,45 1890,34 70,34 70,100 28,142 42,156 42,3542 1754,3542 1797,3585
no net on Top Layer "VoltageMMC" (solid, pour order 3): 1902,34 1912,44 1912,3563 25,3563 36,3552 36,34

## Text inside footprints (layer, text, board x,y; h text height)
DAC_L: Top Overlay "A" at 1315,-75 h50 r270; Top Overlay "1" at 1385,-55 h50; Top Overlay "6" at 1355,-75 h50; Top Overlay "G" at 1365,-55 h50 r270; Bottom Overlay "A" at 1335,-105 h50 r270; Bottom Overlay "1" at 1300,-45 h50 r180; Bottom Overlay "6" at 1320,-70 h50 r180; Bottom Overlay "G" at 1365,-85 h50 r270; Bottom 3D Body "G" at 1365,-150 h50 r270; Bottom 3D Body "6" at 1305,-80 h50 r180; Bottom 3D Body "A" at 1405,-105 h50 r270; Bottom 3D Body "1" at 1455,-205 h50 r180
DAC_R: Top Overlay "A" at 330,-70 h50 r270; Top Overlay "G" at 300,-120 h50 r270; Top Overlay "1" at 400,-100 h50; Top Overlay "6" at 1135,-304 h50; Bottom Overlay "A" at 430,-70 h50 r270; Bottom Overlay "G" at 290,-80 h50 r270; Bottom Overlay "1" at 360,-140 h50 r180; Bottom Overlay "6" at 360,-30 h50 r180; Bottom 3D Body "A" at 430,-100 h50 r270; Bottom 3D Body "G" at 300,-80 h50 r270; Bottom 3D Body "1" at 370,-60 h50 r180; Bottom 3D Body "6" at 410,-30 h50 r180
NPM1300: Top 3D Body "*" at 221.1,2756.5 h50 r90; Top Overlay "*" at 221.1,2701.5 h50 r90
TYPE_C: Top 3D Body "PCB EDGE" at 45.28,3579.8 h24 r180